# Altium PCB PCB-DriverBoard-v1.2.0.PcbDoc
Units mm, origin at the board's own origin, x right, y up, seen from the top; angles counter-clockwise.
Board outline 38 x 32 mm, 2 copper layers (Top Layer, Bottom Layer), stack 1.64 mm thick; 31 components, 22 nets, 68 pads, 84 vias.
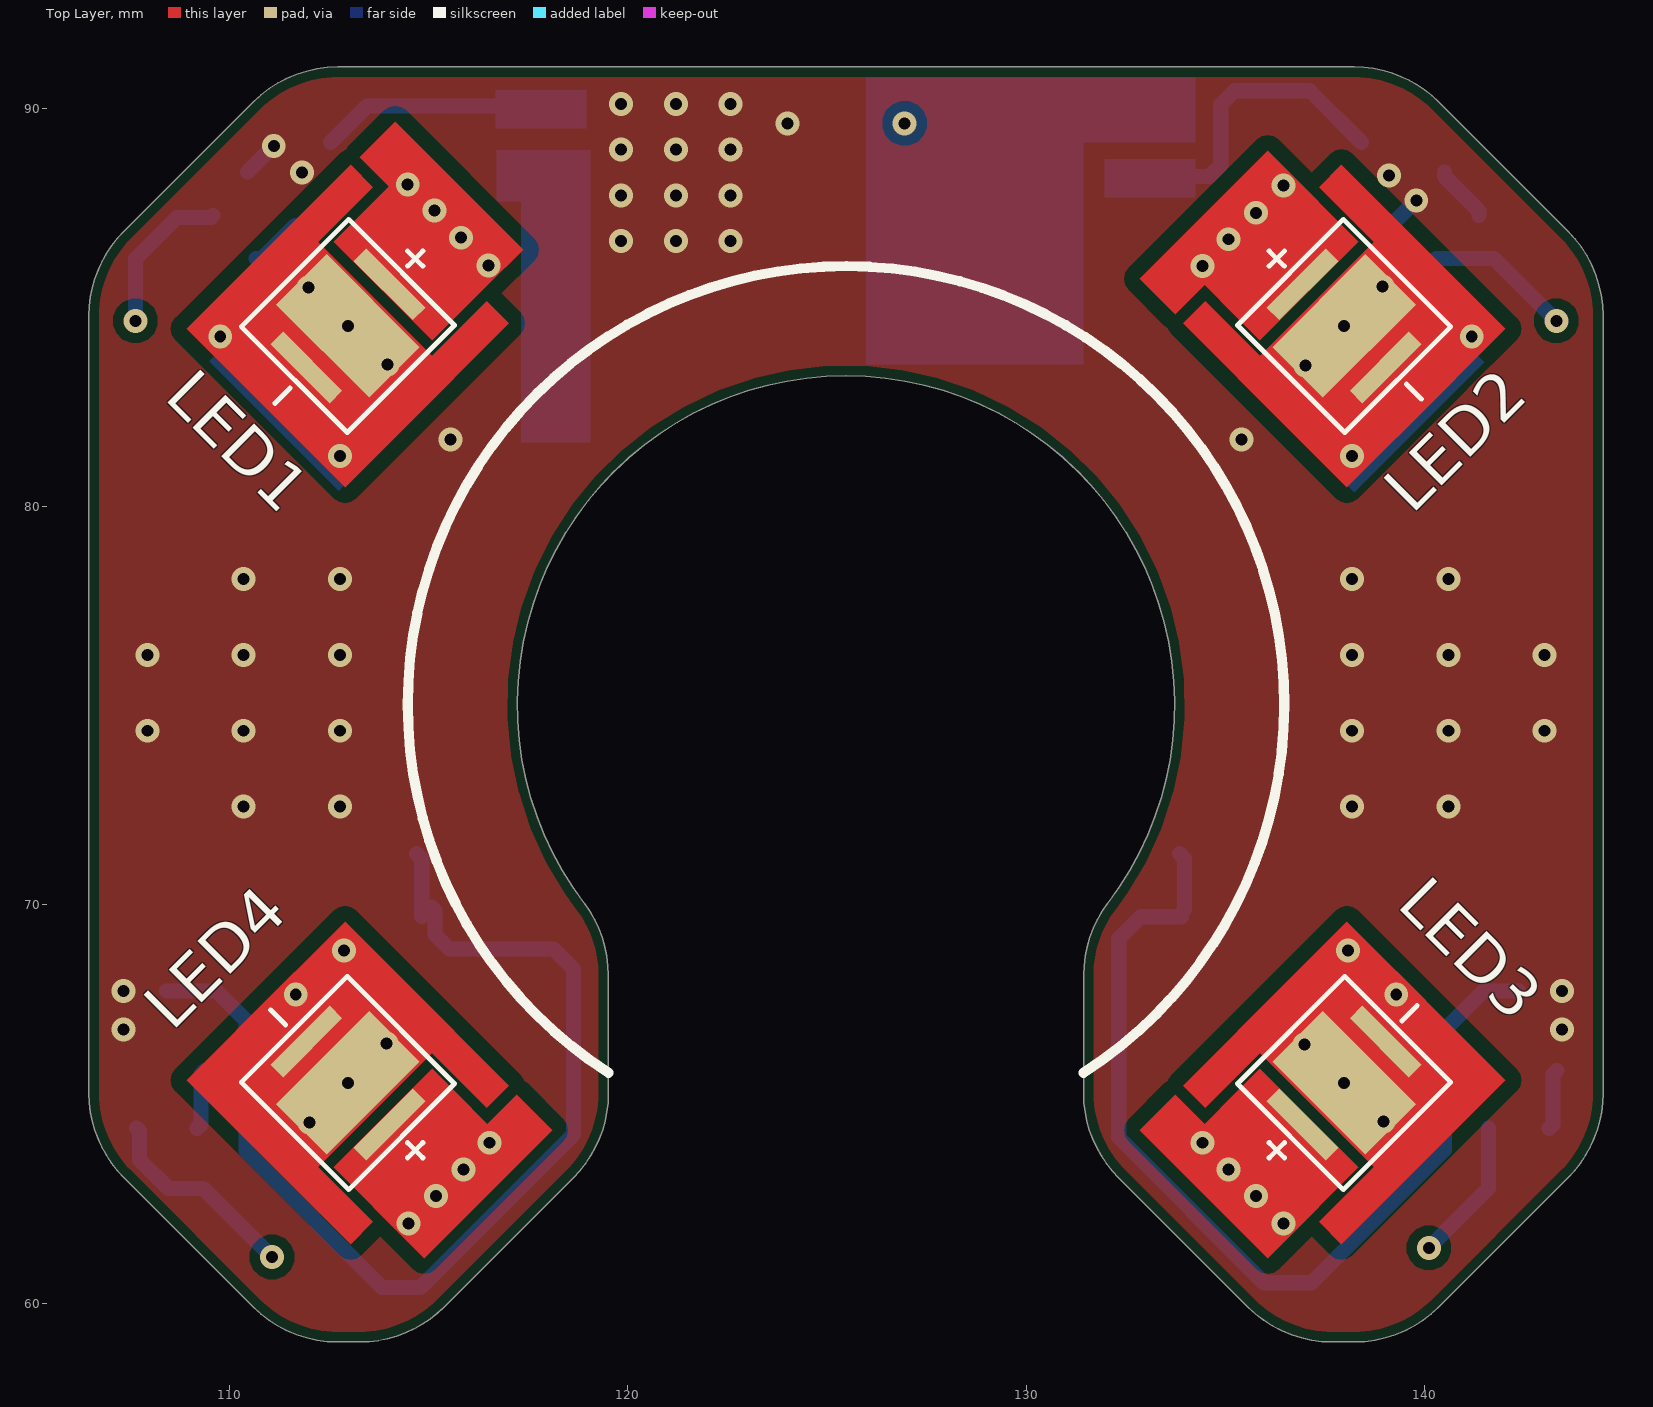
[diagram p0: Top Layer view]
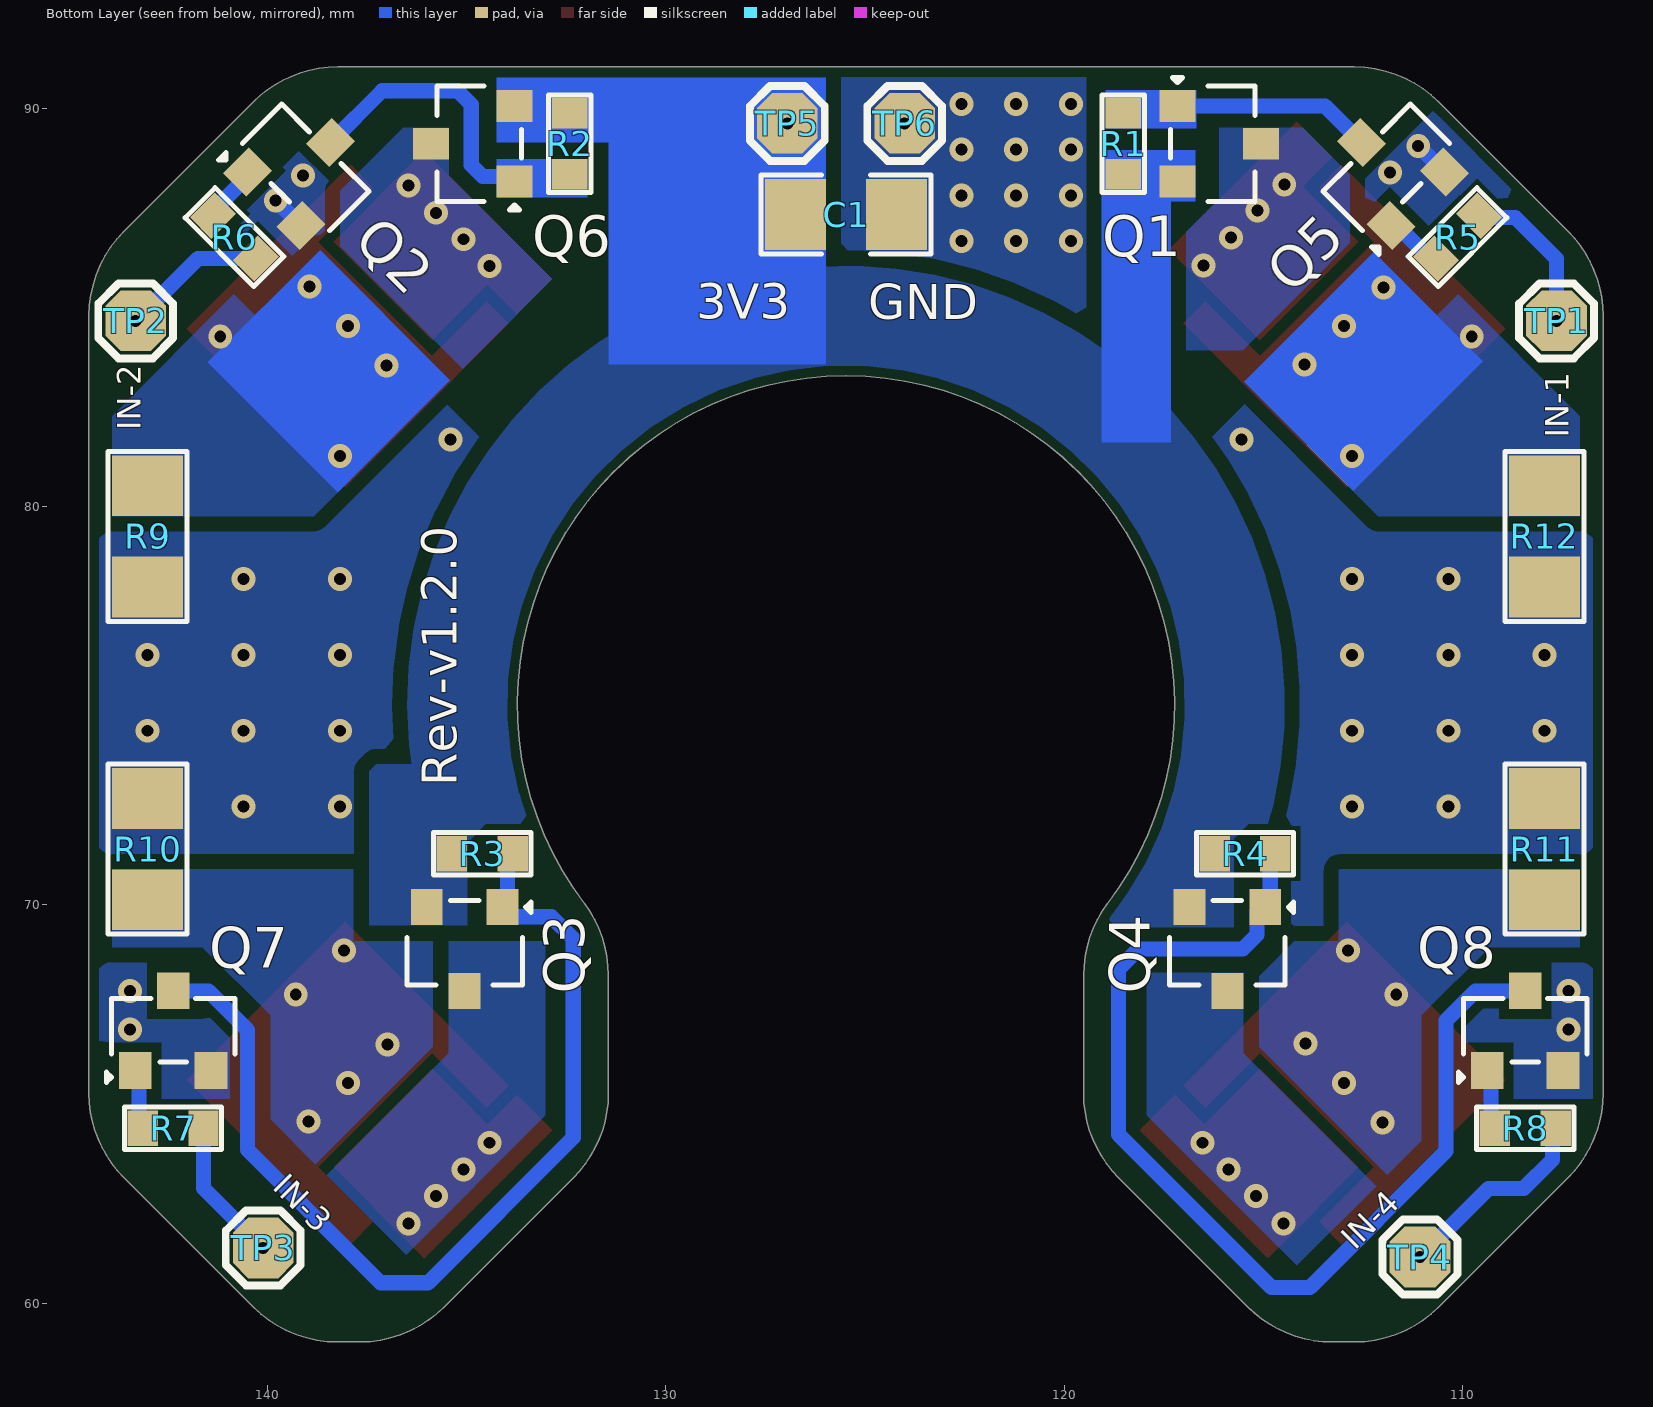
[diagram p1: Bottom Layer view, seen from below]
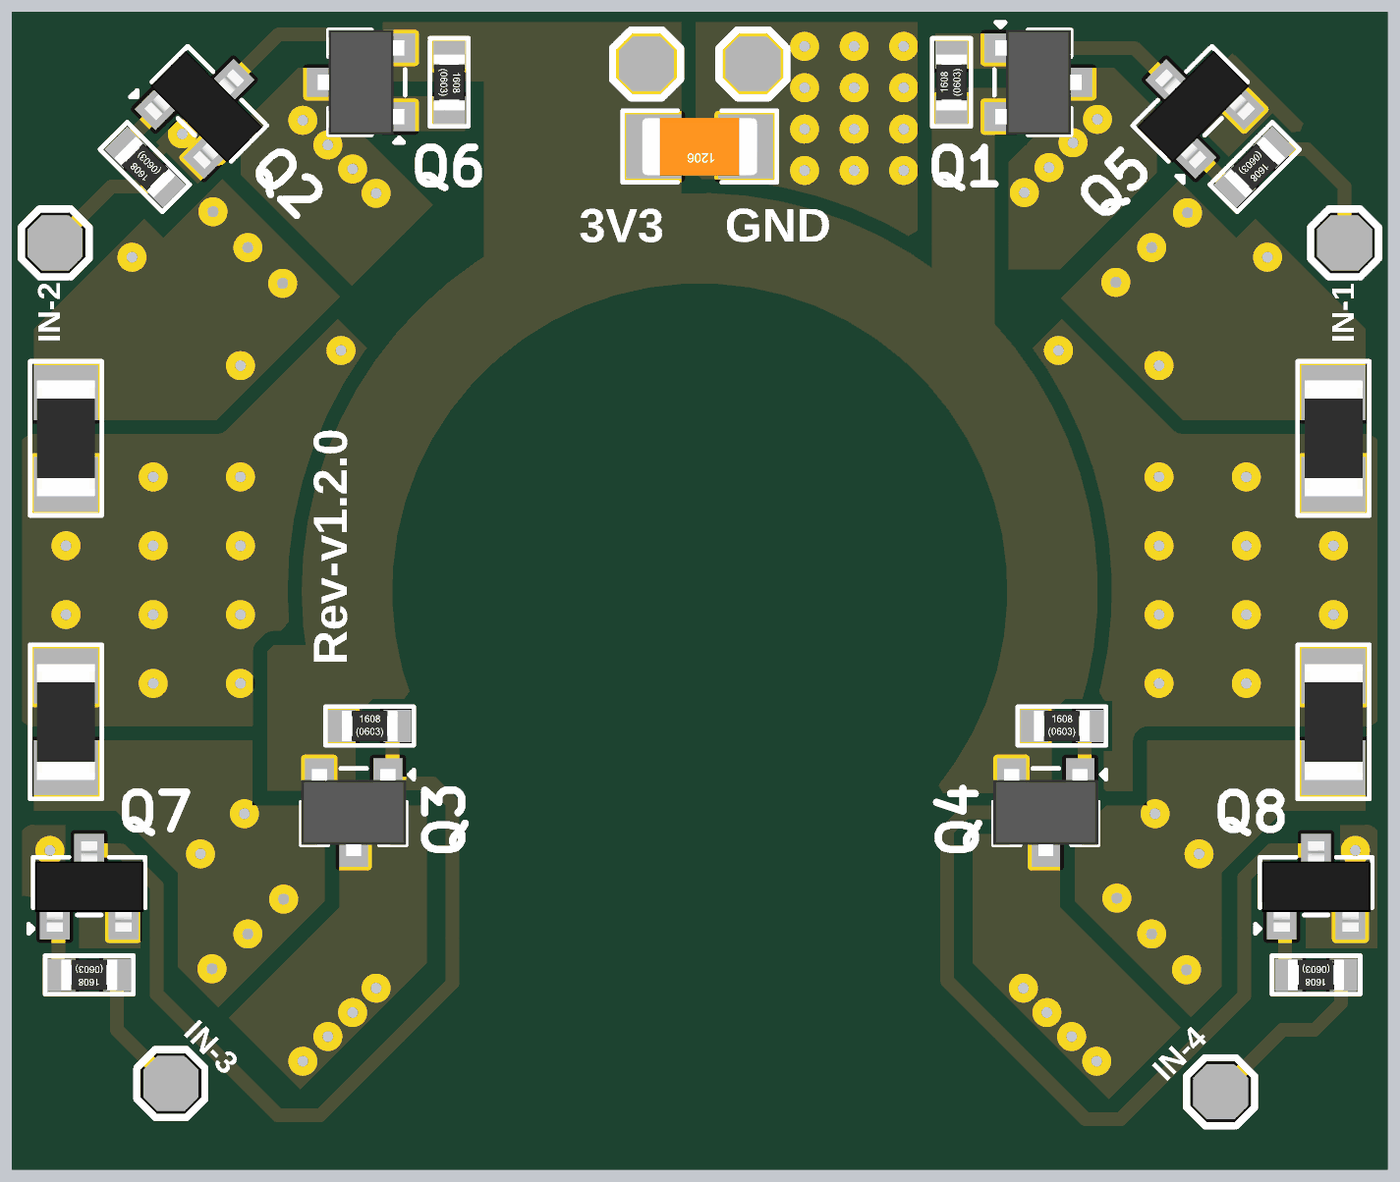
[diagram p2: 3D render of the assembled board from below, using the file's embedded part models]

## Layer stack, top to bottom
Top Solder: solder mask 0.01, Solder Resist, Dk 3.5
Top Layer: signal copper 0.07
Dielectric 1: core 1.5, FR-4, Dk 4.8
Bottom Layer: signal copper 0.07
Bottom Solder: solder mask 0.01, Solder Resist, Dk 3.5

## Board outline
110.601,59.91 ccw(c112.722,62.031) 112.722,59.031 113.273,59.031 ccw(c113.273,62.031) 115.395,59.91 118.637,63.152 ccw(c116.516,65.274) 119.516,65.274 119.516,68.232 ccw(c116.516,68.232) 118.906,70.045 cw(c125.48,75.031) 132.053,70.045 ccw(c134.443,68.232) 131.443,68.232 131.443,65.274 ccw(c134.443,65.274) 132.322,63.152 135.564,59.91 ccw(c137.686,62.031) 137.686,59.031 138.237,59.031 ccw(c138.237,62.031) 140.358,59.91 143.601,63.152 ccw(c141.48,65.274) 144.48,65.274 144.48,84.788 ccw(c141.48,84.788) 143.601,86.91 140.358,90.152 ccw(c138.237,88.031) 138.237,91.031 112.722,91.031 ccw(c112.722,88.031) 110.601,90.152 107.358,86.91 ccw(c109.48,84.788) 106.48,84.788 106.48,65.274 ccw(c109.48,65.274) 107.358,63.152

## Design rules (kind name [scope] priority, off if disabled: settings)
BoardOutlineClearance [All] p1: gap=0 ignorepadtopadclearanceinfootprint=FALSE except(0.254: Poly-OutlineEdge)
Clearance [All] p1: gap=0.254 ignorepadtopadclearanceinfootprint=FALSE except(0: Arc-Hole Track-Hole SMDPad-Hole THPad-Hole Via-Hole Fill-Hole Poly-Hole Region-Hole Text-Hole; 0.381: Fill-Poly Poly-Poly)
MinimumSolderMaskSliver [All] p1: minsoldermaskwidth=0
PolygonConnect [All] p1: connectstyle=Direct reliefconductorwidth=0.254 reliefentries=4 polygonreliefangle="90 Angle" airgapwidth=0.254
RoutingVias [All] p1: holewidth=0.3 width=0.6 viastyle="Through Hole" minholewidth=0.3 minwidth=0.6 maxholewidth=0.3 maxwidth=0.6
SilkToSilkClearance [All] p1: silktosilkclearance=0
SilkToSolderMaskClearance [IsPad] p1: minsilkscreentomaskgap=0 clearancetoexposedcopper=TRUE
SolderMaskExpansion [All] p1: expansion=0.102 istentingtop=FALSE
SupplyNets "Schematic Supply Nets_1" [InNet('GND')] p1: voltage=0.000
SupplyNets "Schematic Supply Nets" [InNet('3V3')] p2: voltage=0.000
UnRoutedNet [All] p1: checkbadconnections=TRUE
Width [All] p1: maxlimit=0.508 minlimit=0.254 preferedwidth=0.381 minimp=50.000000 maximp=50.000000 favimp=50.000000
26 further rules are at their usual default settings.

## Components (designator, comment, footprint, x,y, rotation, side; value= is the part's Value field where it differs from the comment)
C1 "10uF" Cap-1206 125.48,87.325 r0 bottom
LED1 "GW PUSTA1.CM-MENE-XX53-1-1050-R18" "GW PUSTA1.CM-MENE-XX53-1-1050-R18" 112.98,84.531 r135 top
LED2 "GW PUSTA1.CM-MENE-XX53-1-1050-R18" "GW PUSTA1.CM-MENE-XX53-1-1050-R18" 137.98,84.531 r225 top
LED3 "GW PUSTA1.CM-MENE-XX53-1-1050-R18" "GW PUSTA1.CM-MENE-XX53-1-1050-R18" 137.98,65.531 r315 top
LED4 "GW PUSTA1.CM-MENE-XX53-1-1050-R18" "GW PUSTA1.CM-MENE-XX53-1-1050-R18" 112.98,65.531 r45 top
Q1 "SSM3J328R,LF" SOT-23F 116.112,89.103 r270 bottom
Q2 "SSM3J328R,LF" SOT-23F 134.847,89.103 r90 bottom
Q3 "SSM3J328R,LF" SOT-23F 135.052,68.893 r0 bottom
Q4 "SSM3J328R,LF" SOT-23F 115.907,68.893 r0 bottom
Q5 "BC817 6B 160-400" SOT-23 111.837,88.43 r135 bottom
Q6 "BC817 6B 160-400" SOT-23 139.123,88.43 r225 bottom
Q7 "BC817 6B 160-400" SOT-23 142.367,66.843 r180 bottom
Q8 "BC817 6B 160-400" SOT-23 108.433,66.843 r180 bottom
R1 "10K" Res-0603 118.516,89.103 r270 bottom value=10kR
R2 "10K" Res-0603 132.409,89.103 r90 bottom value=10kR
R3 "10K" Res-0603 134.61,71.287 r0 bottom value=10kR
R4 "10K" Res-0603 115.465,71.287 r0 bottom value=10kR
R5 "10K" Res-0603 110.132,86.761 r135 bottom value=10kR
R6 "10K" Res-0603 140.827,86.761 r225 bottom value=10kR
R7 "10K" Res-0603 142.367,64.397 r180 bottom value=10kR
R8 "10K" Res-0603 108.433,64.397 r180 bottom value=10kR
R9 "0.1R" Res-1206 143.009,79.248 r90 bottom
R10 "0.1R" Res-1206 143.009,71.399 r270 bottom
R11 "0.1R" Res-1206 107.95,71.399 r270 bottom
R12 "0.1R" Res-1206 107.95,79.248 r90 bottom
TP1 "TEST POINT" Test-point 107.645,84.658 r0 bottom
TP2 "TEST POINT" Test-point 143.307,84.658 r180 bottom
TP3 "TEST POINT" Test-point 140.106,61.392 r180 bottom
TP4 "TEST POINT" Test-point 111.074,61.163 r180 bottom
TP5 "TEST POINT" Test-point 126.953,89.615 r180 bottom
TP6 "TEST POINT" Test-point 124.006,89.615 r180 bottom

## Footprints (in the part's own frame and the unit in brackets; to place one, negate y for a bottom-side part, rotate by r counter-clockwise, add the part's x,y. Pads: shape width x height; smd on the part's side, far side on the other; paste and mask are expansions set on the pad)
Cap-1206 [mil] "SMD 1206"
  rect 60x70 smd: 1(-50,0) 2(50,0)
  silkscreen extent -84,-39 84,39, body extent -63,-31 63,32, height 39
"GW PUSTA1.CM-MENE-XX53-1-1050-R18" [mm]
  rect 2.1x0.45 smd: 1(0,-1.475) 2(0,1.475)
  rect 3.3x1.8 smd: 2(0,0)
  Top Layer region: -2.818,-2.91 -2.018,-2.91 -2.018,2.91 -2.818,2.91
  Top Layer region: -2.057,-0.9 -1.575,-0.9 -1.575,0.9 -2.057,0.9
  Top Layer region: 2.818,2.91 2.018,2.91 2.018,-2.91 2.818,-2.91
  Top Layer region: 2.057,0.9 1.575,0.9 1.575,-0.9 2.057,-0.9
  Top Layer region: -1.05,1.651 1.041,1.651 1.041,2.921 -1.05,2.921
  Top Layer region: -1.05,-2.921 1.041,-2.921 1.041,-1.651 -1.05,-1.651
  silkscreen extent -1.88,-2.65 1.88,2.67, body extent -1.85,-1.85 1.85,1.85, height 2.15
Res-0603 [mil]
  rect 30x35 smd: 1(-30,0) 2(30,0)
  silkscreen extent -48,-21 48,21, body extent -31,-17 31,17, height 18
Res-1206 [mil]
  rect 60x70 smd: 1(-50,0) 2(50,0)
  silkscreen extent -84,-39 84,39, body extent -63,-31 63,31, height 24
SOT-23 [mm] "TRANS NPN 40V 0.6A SOT23"
  rect 0.82x0.92 smd: 1(-0.95,-1) 2(0.95,-1) 3(0,1)
  silkscreen extent -1.68,-1.3 1.55,0.81, body extent -1.5,-1.25 1.5,1.25, height 1.05
SOT-23F [mm]
  rect 0.8x0.9 smd: 1(-0.95,-1.05) 2(0.95,-1.05) 3(0,1.05)
  silkscreen extent -1.66,-1.22 1.45,0.9, body extent -1.45,-1.2 1.45,1.2, height 0.88
Test-point [mil]
  oct 60x60 smd: 1(0,0)
  silkscreen extent -37,-37 37,37

## Part data
C1: library part CC1206KKX5R9BB106, "CAP CER 10UF 50V X5R 1206", Case Code (Imperial)=1206, Case Code (Metric)=3216, Dielectric=X5R, LCSC Part Number=C100122, Manufacturer=Yageo, Max Operating Temperature=85°C, Min Operating Temperature=-55°C, Supplier Part Number=2072123, Tolerance=10%, Voltage Rating=50V, Case/Package=1206, ComponentLink1Description=https://datasheet.octopart.com/CC1206KKX5R9BB106-Yageo-datasheet-170350636.pdf?src-supplier=Future+Electronics, ComponentLink1URL=https://datasheet.octopart.com/CC1206KKX5R9BB106-Yageo-datasheet-170350636.pdf?src-supplier=Future+Electronics, ComponentLink2Description=https://datasheet.octopart.com/CC1206KKX5R9BB106-Yageo-datasheet-145016144.pdf?src-supplier=Future+Electronics, ComponentLink2URL=https://datasheet.octopart.com/CC1206KKX5R9BB106-Yageo-datasheet-145016144.pdf?src-supplier=Future+Electronics, ComponentLink3Description=http://www.yageo.com/documents/recent/UPY-GPHC_X5R_4V-to-50V_25.pdf?src-supplier=Digikey, ComponentLink3URL=http://www.yageo.com/documents/recent/UPY-GPHC_X5R_4V-to-50V_25.pdf?src-supplier=Digikey, Halogen Free="Halogen Free", Height=1.9mm, Item Type=Capacitors, Lead Free="Lead Free", Length=0.126inch, Manufacturer Part Number=CC1206KKX5R9BB106, Material=4241ConductorMaterial, Mounting Technology="Surface Mount", Packaging="Cut Tape", Pricing="2000=0.0907, 6000=0.0872, 10000=0.0856, 30000=0.0823, 50000=0.0795 (USD)", RoHS=Yes, RoHS Compliant=Yes, Series=CC, Stock=220000, Supplier="Future Electronics", Thickness=0.075inch, Voltage Rating (DC)=50V, Width=0.063inch
LED1 LED2 LED3 LED4: "LED OSCONIQ COOL WHT 5000K 3SMD", Manufacturer="ams-OSRAM USA INC.", Package=Custom, ComponentLink1Description=Digikey, ComponentLink1URL=https://www.digikey.nl/en/products/detail/ams-osram-usa-inc/GW-PUSTA1-CM-MENE-XX53-1-1050-R18/11643254, Item Type=LED, Manufacturer Part Number="GW PUSTA1.CM-MENE-XX53-1-1050-R18"
Q1 Q2 Q3 Q4: "MOSFET P-CH 20V 6A SOT23F", Case/Package=SOT-23-3, Continuous Drain Current (ID)=6A, Drain to Source Resistance=47.4mR, Drain to Source Voltage (Vdss)=20V, Gate to Source Voltage (Vgs)=8V, Input Capacitance=840pF, LCSC Part Number=C396016, Manufacturer=Toshiba, Max Operating Temperature=150°C, Max Power Dissipation=1W, Min Operating Temperature=-55°C, Package Quantity=3000, ComponentLink1Description=https://datasheet.ciiva.com/11158/ssm3j328r-datasheet-en-20140301-11158652.pdf?src-supplier=Avnet, ComponentLink1URL=https://datasheet.ciiva.com/11158/ssm3j328r-datasheet-en-20140301-11158652.pdf?src-supplier=Avnet, ComponentLink2Description=https://datasheet.ciiva.com/24106/ssm3j328r-datasheet-en-20140301-24106699.pdf?src-supplier=Mouser, ComponentLink2URL=https://datasheet.ciiva.com/24106/ssm3j328r-datasheet-en-20140301-24106699.pdf?src-supplier=Mouser, ComponentLink3Description=https://datasheet.ciiva.com/45425/ssm3j328r-datasheet-en-20140301-45425519.pdf?src-supplier=Digikey, ComponentLink3URL=https://datasheet.ciiva.com/45425/ssm3j328r-datasheet-en-20140301-45425519.pdf?src-supplier=Digikey, ComponentLink4Description=https://datasheet.ciiva.com/45425/ssm3j328r-datasheet-en-20140301-45425813.pdf?src-supplier=Digikey, ComponentLink4URL=https://datasheet.ciiva.com/45425/ssm3j328r-datasheet-en-20140301-45425813.pdf?src-supplier=Digikey, Item Type=MOSFETs, Manufacturer Part Number=SSM3J328R,LF, Mounting Technology="Surface Mount", Number of Channels=1, Packaging="Tape and Reel", Polarity=P-CHANNEL, Pricing="1=0.41, 10=0.252, 100=0.1588, 500=0.11846, 1000=0.10542 (USD)", Radiation Hardening=No, Rds On Max=29.8mR, RoHS=Yes, RoHS Compliant=Yes, Stock=582786, Supplier=Digikey, Turn-Off Delay Time=107ns, Turn-On Delay Time=32ns
Q5 Q6 Q7 Q8: "45V 300mW 100@100mA,1V 500mA NPN SOT-23 Bipolar Transistors - BJT ROHS", LCSC Part Number=C371086, Manufacturer=DOWO, Package=SOT-23, ComponentLink1Description=LCSC, ComponentLink1URL=https://www.lcsc.com/product-detail/Bipolar-Transistors-BJT_DOWO-BC817-6B-160-400_C371086.html, Item Type=Transistor, Manufacturer Part Number="BC817 6B 160-400"
R1 R2 R3 R4 R5 R6 R7 R8: library part RT0603BRD0710KL, "RES SMD 10K OHM 0.1% 1/10W 0603", Case/Package=0603, LCSC Part Number=C95204, Manufacturer=Yageo, Max Operating Temperature=155°C, Min Operating Temperature=-55°C, Package Height=0.45mm, Package Length=1.6mm, Package Style=SMTMeter, Package Width=0.8mm, Power=100mW, Rated Temperature=70°C, Resistor Type="FIXED RESISTOR", Supplier Part Number 1=1991391P, Temperature Coefficient=25ppm/°C, Tolerance=0.1%, Working Voltage=75V, Category="Chip SMD Resistors", ComponentLink1Description=https://datasheet.ciiva.com:443/pdfs/VipMasterIC/IC/YAGO/YAGO-S-A0008510989/YAGO-S-A0008510989-1.pdf?src-supplier=IHS+Markit, ComponentLink1URL=https://datasheet.ciiva.com:443/pdfs/VipMasterIC/IC/YAGO/YAGO-S-A0008510989/YAGO-S-A0008510989-1.pdf?src-supplier=IHS+Markit, ComponentLink2Description=https://datasheet.ciiva.com/5624/pyu-rt-1-to-0-05-rohs-l-4-5624351.pdf?src-supplier=Mouser, ComponentLink2URL=https://datasheet.ciiva.com/5624/pyu-rt-1-to-0-05-rohs-l-4-5624351.pdf?src-supplier=Mouser, ComponentLink3Description=https://datasheet.ciiva.com/29721/pyu-rt-1-to-0-05-rohs-l-4-29721177.pdf?src-supplier=Digi-Key, ComponentLink3URL=https://datasheet.ciiva.com/29721/pyu-rt-1-to-0-05-rohs-l-4-29721177.pdf?src-supplier=Digi-Key, Construction=Chip, Item Type=Resistor, Manufacturer Part Number=RT0603BRD0710KL, Mounting Technology="Surface Mount", Packaging="Tape and Reel", Pins=2, Pricing 1="100=0.29800, 250=0.27800, 500=0.25900, 1000=0.23700 (GBP)", Reach SVHC Compliant=Yes, RoHS=Yes, RoHS Compliant=Yes, Stock 1=20510, Supplier 1=Rs, Technology="THIN FILM", Termination=Wraparound
R9 R10 R11 R12: library part RL1206FR-070R1L, "RES 0.1 OHM 1% 1/4W 1206", Manufacturer=Yageo, Supplier Part Number=1607134, ComponentLink1Description=https://datasheet.ciiva.com/22699/877049-22699038.pdf?src-supplier=Element14, ComponentLink1URL=https://datasheet.ciiva.com/22699/877049-22699038.pdf?src-supplier=Element14, ComponentLink2Description=https://datasheet.ciiva.com/5558/pyu-rl-hp-521-rohs-l-2-5558071.pdf?src-supplier=Mouser, ComponentLink2URL=https://datasheet.ciiva.com/5558/pyu-rl-hp-521-rohs-l-2-5558071.pdf?src-supplier=Mouser, Item Type=Resistor, Lead Free=5697LeadFree, Manufacturer Part Number=RL1206FR-070R1L, Pricing="5000=0.0214, 15000=0.02, 20000=0.0205, 25000=0.0197, 75000=0.0197, 125000=0.0184, 150000=0.0193, 375000=0.0184 (USD)", RoHS=Yes, Stock=10000, Supplier="Future Electronics"
TP1 TP2 TP3 TP4 TP5 TP6: "Test Point ON", Item Type="TEST POINT"

## Via types
v1: diameter 0.6, hole 0.3, Top Layer to Bottom Layer, 84 vias

## Nets (pads, with @x,y where several pads share a name; then routed paths per layer and width w, separated by ;. In a path a pad name is that pad's centre, name@x,y a point inside that pad or via, vN(x,y) a via of type N, cw(c..) or ccw(c..) an arc to the next point about the centre after c; other vN are vias at no path point)
3V3: C1.2 Q1.2 Q2.2 Q3.2 Q4.2 R1.2 R2.2 R3.2 R4.2 TP5.1
  other v1: 126.953,89.615
GND: C1.1 Q5.2 Q6.2 Q7.2 Q8.2 R9.1 R10.1 R11.1 R12.1 TP6.1 | length 1.9
  Bottom Layer w0.381: Q5.2 111.108,89.045 v1(111.118,89.045) ; Q6.2 139.162,87.051 139.788,87.676 v1(139.792,87.676) ; Q7.2 Q7.2@141.417,65.893
  other v1: 107.346,66.87 143.454,66.87 107.346,67.843 143.454,67.843 110.363,72.466 112.776,72.466 138.183,72.466 140.596,72.466 107.95,74.371 110.363,74.371 112.776,74.371 138.183,74.371 140.596,74.371 143.009,74.371 107.95,76.276 110.363,76.276 112.776,76.276 138.183,76.276 140.596,76.276 143.009,76.276 110.363,78.181 112.776,78.181 138.183,78.181 140.596,78.181 115.557,81.682 135.403,81.682 119.837,86.665 121.209,86.665 122.58,86.665 119.837,87.81 121.209,87.81 122.58,87.81 139.112,88.311 111.823,88.383 119.837,88.954 121.209,88.954 122.58,88.954 124.006,89.615 119.837,90.099 121.209,90.099 122.58,90.099
IN#1: R5.2 TP1.1 | length 4
  Bottom Layer w0.381: v1(107.645,84.658) 107.645,86.219 108.682,87.255 109.549,87.255 R5.2
IN#2: R6.2 TP2.1 | length 3.7
  Bottom Layer w0.381: R6.2 141.743,86.222 v1(143.307,84.658)
IN#3: R7.2 TP3.1 | length 3.6
  Bottom Layer w0.381: v1(140.106,61.392) 141.605,62.89 R7.2
IN#4: R8.2 TP4.1 | length 5.2
  Bottom Layer w0.381: R8.2 107.748,64.32 107.748,63.604 108.472,62.881 109.357,62.881 v1(111.074,61.163)
NetLED1_1: LED1.1 Q1.3
  other v1: 116.502,86.052 115.819,86.745 115.155,87.43 114.48,88.079
NetLED1_2: LED1.2 R12.2
  other v1: 112.776,81.262 113.971,83.567 109.775,84.263 112.98,84.531 111.989,85.494
NetLED2_1: LED2.1 Q2.3
  other v1: 134.431,86.031 135.081,86.706 135.765,87.371 136.458,88.053
NetLED2_2: LED2.2 R9.2
  other v1: 138.183,81.262 137.016,83.54 141.184,84.263 137.98,84.531 138.943,85.522
NetLED3_1: LED3.1 Q3.3
  other v1: 136.458,62.008 135.765,62.691 135.081,63.356 134.431,64.031
NetLED3_2: LED3.2 R10.2
  other v1: 138.971,64.567 137.98,65.531 136.989,66.494 139.29,67.747 138.074,68.859
NetLED4_1: LED4.1 Q4.3
  other v1: 114.501,62.008 115.194,62.691 115.879,63.356 116.528,64.031
NetLED4_2: LED4.2 R11.2
  other v1: 112.016,64.54 112.98,65.531 113.943,66.522 111.669,67.747 112.885,68.859
NetQ1_1: Q1.1 Q5.3 R1.1 | length 6.4
  Bottom Layer w0.381: Q5.3 113.46,90.053 Q1.1 117.256,89.959 118.422,89.959 R1.1
NetQ2_1: Q2.1 Q6.3 R2.1 | length 7
  Bottom Layer w0.381: R2.1 R2.1@132.503,88.247 ; Q2.1@133.891,88.247 133.926,88.282 134.596,88.282 134.886,88.573 134.886,90.092 135.227,90.433 137.12,90.433 Q6.3
NetQ3_1: Q3.1 Q7.3 R3.1 | length 24.6
  Bottom Layer w0.381: R3.1 133.975,71.16 133.975,69.883 Q3.1@133.941,69.849 ; Q3.1@133.892,69.701 132.869,69.701 132.324,69.156 132.324,64.166 135.975,60.515 137.157,60.515 140.498,63.857 140.498,66.859 141.483,67.843 Q7.3
NetQ4_1: Q4.1 Q8.3 R4.1 | length 27.1
  Bottom Layer w0.381: Q8.3 109.677,67.843 110.417,67.103 110.417,63.821 113.838,60.401 114.8,60.401 118.637,64.238 118.637,68.395 118.141,68.891 115.521,68.891 115.161,69.251 115.161,69.861 Q4.1@115.079,69.943 ; R4.1 114.83,71.16 114.83,69.711 Q4.1@114.835,69.706
NetQ5_1: Q5.1 R5.1 | length 1.5
  Bottom Layer w0.381: R5.1 110.822,86.222 111.651,87.051 Q5.1
NetQ6_1: Q6.1 R6.1 | length 1.5
  Bottom Layer w0.381: Q6.1 140.502,88.279 141.366,87.415 R6.1
NetQ7_1: Q7.1 R7.1 | length 1.5
  Bottom Layer w0.381: R7.1 143.223,64.491 143.223,65.749 Q7.1
NetQ8_1: Q8.1 R8.1 | length 1.5
  Bottom Layer w0.381: R8.1 109.289,64.491 109.289,65.749 Q8.1

## Polygon pours and split planes (outlines as drawn)
GND on Bottom Layer "GND_L02_P010" (solid, remove dead copper, pour order 10): 110.601,59.91 ccw(c112.722,62.031) 112.722,59.031 113.273,59.031 ccw(c113.273,62.031) 115.395,59.91 118.637,63.152 ccw(c116.516,65.274) 119.516,65.274 119.516,68.232 ccw(c116.516,68.232) 118.906,70.045 cw(c125.48,75.031) 132.053,70.045 ccw(c134.443,68.232) 131.443,68.232 131.443,65.274 ccw(c134.443,65.274) 132.322,63.152 135.564,59.91 ccw(c137.686,62.031) 137.686,59.031 138.237,59.031 ccw(c138.237,62.031) 140.358,59.91 143.601,63.152 ccw(c141.48,65.274) 144.48,65.274 144.48,84.788 ccw(c141.48,84.788) 143.601,86.91 140.358,90.152 ccw(c138.237,88.031) 138.237,91.031 112.722,91.031 ccw(c112.722,88.031) 110.601,90.152 107.358,86.91 ccw(c109.48,84.788) 106.48,84.788 106.48,65.274 ccw(c109.48,65.274) 107.358,63.152
NetLED4_2 on Bottom Layer "NETLED4_2_L02_P009" (solid, pour order 9): 115.103,68.214 114.229,69.088 113.113,69.088 113.113,70.891 107.061,70.891 107.061,68.936 109.329,68.936 111.037,67.227 111.037,64.084 111.893,63.228 115.103,66.438
NetLED3_2 on Bottom Layer "NETLED3_2_L02_P008" (solid, pour order 8): 135.857,69.088 137.846,69.088 137.846,70.891 143.898,70.891 143.898,68.936 141.63,68.936 139.922,67.227 139.922,64.62 138.798,63.496 135.857,66.438
NetLED3_1 on Bottom Layer "NETLED3_1_L02_P007" (solid, pour order 7): 135.452,69.088 135.452,66.274 138.514,63.212 136.522,61.22 133.024,64.719 133.024,69.088
NetLED4_1 on Bottom Layer "NETLED4_1_L02_P005" (solid, pour order 5): 115.507,68.293 115.507,66.274 112.177,62.944 114.169,60.952 117.935,64.719 117.935,68.293
NetLED1_2 on Bottom Layer "NETLED1_2_L02_P004" (solid, pour order 4): 107.061,79.756 112.123,79.756 113.901,81.534 110.113,85.322 107.061,82.27
NetLED2_2 on Bottom Layer "NETLED2_2_L02_P003" (solid, pour order 3): 143.898,79.756 138.836,79.756 137.058,81.534 140.846,85.322 143.898,82.27
NetLED1_1 on Bottom Layer "NETLED1_1_L02_P002" (solid, pour order 2): 114.013,89.503 112.834,88.324 112.834,86.613 113.843,85.604 115.527,83.919 117.032,83.919 117.032,86.796 116.112,87.716 116.112,89.503
NetLED2_1 on Bottom Layer "NETLED2_1_L02_P001" (solid, pour order 1): 134.626,83.935 135.102,83.459 138.176,86.533 138.176,87.918 136.591,89.503 135.447,89.503 135.447,88.305 132.852,85.71
3V3 on Bottom Layer "3V3_L02_P000" (solid, pour order 0): 134.518,72.034 134.991,71.562 134.991,70.731 134.991,69.494 137.449,69.494 137.449,73.533 136.377,73.533 ccw(c125.48,75.031) 114.896,72.034 115.371,72.034 115.748,71.658 115.748,69.44 119.282,69.42 cw(c125.842,74.984) 117.899,78.285 cw(c125.442,75.123) 128.604,82.666 cw(c125.552,75.061) 133.167,72.034
GND on Top Layer "GND_L01_P011" (solid, pour order 11): 110.601,59.91 ccw(c112.722,62.031) 112.722,59.031 113.273,59.031 ccw(c113.273,62.031) 115.395,59.91 118.637,63.152 ccw(c116.516,65.274) 119.516,65.274 119.516,68.232 ccw(c116.516,68.232) 118.906,70.045 cw(c125.48,75.031) 132.053,70.045 ccw(c134.443,68.232) 131.443,68.232 131.443,65.274 ccw(c134.443,65.274) 132.322,63.152 135.564,59.91 ccw(c137.686,62.031) 137.686,59.031 138.237,59.031 ccw(c138.237,62.031) 140.358,59.91 143.601,63.152 ccw(c141.48,65.274) 144.48,65.274 144.48,84.788 ccw(c141.48,84.788) 143.601,86.91 140.358,90.152 ccw(c138.237,88.031) 138.237,91.031 112.722,91.031 ccw(c112.722,88.031) 110.601,90.152 107.358,86.91 ccw(c109.48,84.788) 106.48,84.788 106.48,65.274 ccw(c109.48,65.274) 107.358,63.152

## Other copper
Top Layer:
  region net NetLED3_2: 142.037,65.604 138.052,69.588 135.303,66.839 139.288,62.855
  region net NetLED4_2: 112.907,69.588 108.922,65.604 111.671,62.855 115.656,66.839
  region net NetLED3_1: 133.747,65.248 132.846,64.346 136.063,61.128 136.965,62.03
  region net NetLED3_1: 133.868,63.895 136.349,61.414 138.349,63.414 135.868,65.895
  region net NetLED4_1: 113.994,62.03 114.896,61.128 118.114,64.346 117.212,65.248
  region net NetLED4_1: 115.091,65.895 112.61,63.414 114.61,61.414 117.091,63.895
  region net NetLED1_2: 108.922,84.458 112.907,80.474 115.656,83.223 111.671,87.207
  region net NetLED2_2: 138.053,80.474 142.037,84.458 139.288,87.207 135.303,83.223
  region net NetLED1_1: 112.615,86.642 115.096,84.161 117.096,86.161 114.615,88.642
  region net NetLED1_1: 116.48,85.546 117.382,86.447 114.165,89.665 113.263,88.763
  region net NetLED2_1: 136.965,88.032 136.063,88.934 132.846,85.716 133.747,84.814
  region net NetLED2_1: 135.868,84.167 138.349,86.648 136.349,88.648 133.868,86.167
Bottom Layer:
  region net NetQ1_1: 118.961,90.453 116.678,90.453 116.678,89.484 118.961,89.484
  rectangle net NetQ2_1: 131.964,87.753 134.247,88.722
  region net NetLED1_2: 112.233,86.391 109.488,83.646 112.748,80.385 115.494,83.131
  region net NetLED2_2: 141.502,83.615 138.681,86.436 135.419,83.174 138.24,80.353
  rectangle net 3V3: 117.324,81.61 119.064,88.95
  rectangle net 3V3: 125.988,89.129 134.247,90.772
  rectangle net 3V3: 125.988,83.566 131.445,90.678
  rectangle net 3V3: 116.712,87.653 119.064,88.95
  pour cut-out: 117.884,89.002 117.884,90.83 119.453,90.83 119.453,89.002
  pour cut-out: 140.952,63.788 144.191,63.788 144.191,65.134 140.952,65.134
  pour cut-out: 109.316,63.788 106.609,63.788 106.609,65.134 109.316,65.134
  pour cut-out: 138.632,89.499 139.745,88.385 140.697,89.337 139.584,90.451
  pour cut-out: 110.755,89.915 111.868,88.802 112.82,89.753 111.706,90.867
  pour cut-out: 109.12,86.867 110.234,85.753 111.186,86.705 110.072,87.819
  pour cut-out: 135.723,82.795 134.61,81.682 133.658,82.634 134.771,83.747
  pour cut-out: 115.236,82.795 116.35,81.682 117.301,82.634 116.188,83.747

## Silkscreen, mask and mechanical layers (free items; w line width, h text height)
Top Overlay:
  lines w0.254: 119.516,65.788 cw(c125.48,75.031) 114.48,75.031 cw(c125.48,75.031) 131.443,65.788
Bottom Overlay:
  text "3V3" at 129.244,84.42 h1.5
  text "GND" at 124.919,84.413 h1.5
  text "IN-2" at 142.985,81.907 h1 r270
  text "IN-1" at 107.146,81.73 h1 r270
  text "Rev-v1.2.0" at 134.964,72.977 h1.5 r270
  text "IN-3" at 140.049,62.747 h1 r45
  text "IN-4" at 112.566,61.176 h1 r315
Dimension:
  lines w0.013: 131.443,65.788 ccw(c125.48,75.031) 114.48,75.031 ; 114.48,75.031 ccw(c125.48,75.031) 119.516,65.788 ; 114.48,75.031 ccw(c125.48,75.031) 119.516,65.788 ; 114.48,75.031 ccw(c125.48,75.031) 119.516,65.788
  lines w0.254: 112.98,65.531 137.98,65.531 ; 112.98,65.531 112.98,84.531 ; 112.98,65.531 137.98,84.531 ; 112.98,84.531 137.98,84.531 ; 112.98,84.531 137.98,65.531 ; 137.98,65.531 137.98,84.531
Board Outline:
  lines w0.254: 106.48,65.274 ccw(c109.48,65.274) 107.358,63.152 110.601,59.91 ccw(c112.722,62.031) 112.722,59.031 113.273,59.031 ccw(c113.273,62.031) 115.395,59.91 118.637,63.152 ccw(c116.516,65.274) 119.516,65.274 119.516,65.788 119.516,68.232 ccw(c116.516,68.232) 118.906,70.045 cw(c125.48,75.031) 132.053,70.045 ccw(c134.443,68.232) 131.443,68.232 131.443,65.788 131.443,65.274 ccw(c134.443,65.274) 132.322,63.152 135.564,59.91 ccw(c137.686,62.031) 137.686,59.031 138.237,59.031 ccw(c138.237,62.031) 140.358,59.91 143.601,63.152 ccw(c141.48,65.274) 144.48,65.274 144.48,84.788 ccw(c141.48,84.788) 143.601,86.91 140.358,90.152 ccw(c138.237,88.031) 138.237,91.031 112.722,91.031 ccw(c112.722,88.031) 110.601,90.152 107.358,86.91 ccw(c109.48,84.788) 106.48,84.788 106.48,65.274
Fabrication:
  drawing of 191 lines, arcs and shapes, not listed
  text "Fabrication Notes:" at 155.639,100.73 h6
  text "2 Oz Copper Weight" at 155.428,94.052 h4
  text "Untented Vias" at 155.431,90.011 h4
  text "Layer" at 157.593,81.698 h1.52
  text "Name" at 168.005,81.698 h1.52
  text "Material" at 191.62,81.698 h1.52
  text "Thickness" at 213.459,81.698 h1.52
  text "Constant" at 229.964,81.698 h1.52
  text "Board Layer Stack" at 244.439,81.698 h1.52
  text "Top Overlay" at 168.005,78.65 h1.52
  text "Top Solder" at 168.005,75.602 h1.52
  text "Solder Resist" at 191.62,75.602 h1.52
  text "0.39mil" at 213.459,75.602 h1.52
  text "3.5" at 229.964,75.602 h1.52
  text "1" at 157.593,72.554 h1.52
  text "Top Layer" at 168.005,72.554 h1.52
  text "2.76mil" at 213.459,72.554 h1.52
  text "Dielectric 1" at 168.005,69.506 h1.52
  text "FR-4" at 191.62,69.506 h1.52
  text "59.06mil" at 213.459,69.506 h1.52
  text "4.8" at 229.964,69.506 h1.52
  text "2" at 157.593,66.458 h1.52
  text "Bottom Layer" at 168.005,66.458 h1.52
  text "2.76mil" at 213.459,66.458 h1.52
  text "Bottom Solder" at 168.005,63.41 h1.52
  text "Solder Resist" at 191.62,63.41 h1.52
  text "0.39mil" at 213.459,63.41 h1.52
  text "3.5" at 229.964,63.41 h1.52
  text "Bottom Overlay" at 168.005,60.362 h1.52
  text "Total board thickness:" at 157.593,57.314 h1.52
  text "65.35mil" at 213.459,57.314 h1.52
Drill Drawing:
  lines w0.254: 107.754,114.922 109.448,114.922 109.448,116.616 107.754,116.616 107.754,114.922
  lines w0.381: 106.236,113.779 371.694,113.779 ; 106.236,117.589 371.694,117.589 ; 120.228,109.969 120.228,121.399 ; 133.94,109.969 133.94,121.399 ; 161.11,109.969 161.11,121.399 ; 173.96,109.969 173.96,121.399 ; 192.598,109.969 192.598,121.399 ; 230.687,109.969 230.687,121.399 ; 245.669,109.969 245.669,121.399 ; 264.612,109.969 264.612,121.399 ; 281.118,109.969 281.118,121.399 ; 302.803,109.969 302.803,121.399 ; 336.677,109.969 336.677,121.399 ; 106.236,109.969 371.694,109.969 371.694,121.399 106.236,121.399 106.236,109.969
  text "Symbol" at 108.521,118.732 h1.83
  text "Count" at 121.371,118.732 h1.83
  text "Hole Size" at 135.083,118.732 h1.83
  text "Plated" at 162.253,118.732 h1.83
  text "Hole Type" at 175.103,118.732 h1.83
  text "Drill Layer Pair" at 193.741,118.732 h1.83
  text "Via/Pad" at 231.83,118.732 h1.83
  text "Pad Shape" at 246.812,118.732 h1.83
  text "Template" at 265.755,118.732 h1.83
  text "Description" at 282.261,118.732 h1.83
  text "Hole Tolerance (+)" at 303.946,118.732 h1.83
  text "Hole Tolerance (-)" at 337.82,118.732 h1.83
  text "84" at 121.371,114.922 h1.52
  text "0.300mm (11.81mil)" at 135.083,114.922 h1.52
  text "PTH" at 162.253,114.922 h1.52
  text "Round" at 175.103,114.922 h1.52
  text "Top Layer - Bottom Layer" at 193.741,114.922 h1.52
  text "Via" at 231.83,114.922 h1.52
  text "Rounded" at 246.812,114.922 h1.52
  text "v60h30" at 265.755,114.922 h1.52
  text "84 Total" at 121.371,111.112 h1.52

## Dimensions
109.48,84.788 to 104.013,89.281 on Dimension
112.722,88.031 to 116.992,93.091 on Dimension
125.48,75.031 to 130.632,75.489 on Board Outline
138.237,91.031 to 137.686,59.031 on Dimension
106.48,84.788 to 144.48,84.788 on Dimension